# Altium PCB Auto_USBC_15W_TPS25833Q1.PcbDoc (part 2 of 2)
Units mm, origin at the board's own origin, x right, y up, seen from the top; angles counter-clockwise.
Board outline 23 x 48.5 mm, 4 copper layers (L1_Top, L2_GND, L3_GND, L4_Bottom), stack 1.564 mm thick; 40 components, 24 nets, 137 pads, 9 vias.
Unrouted connection lines stored in the file: 104.
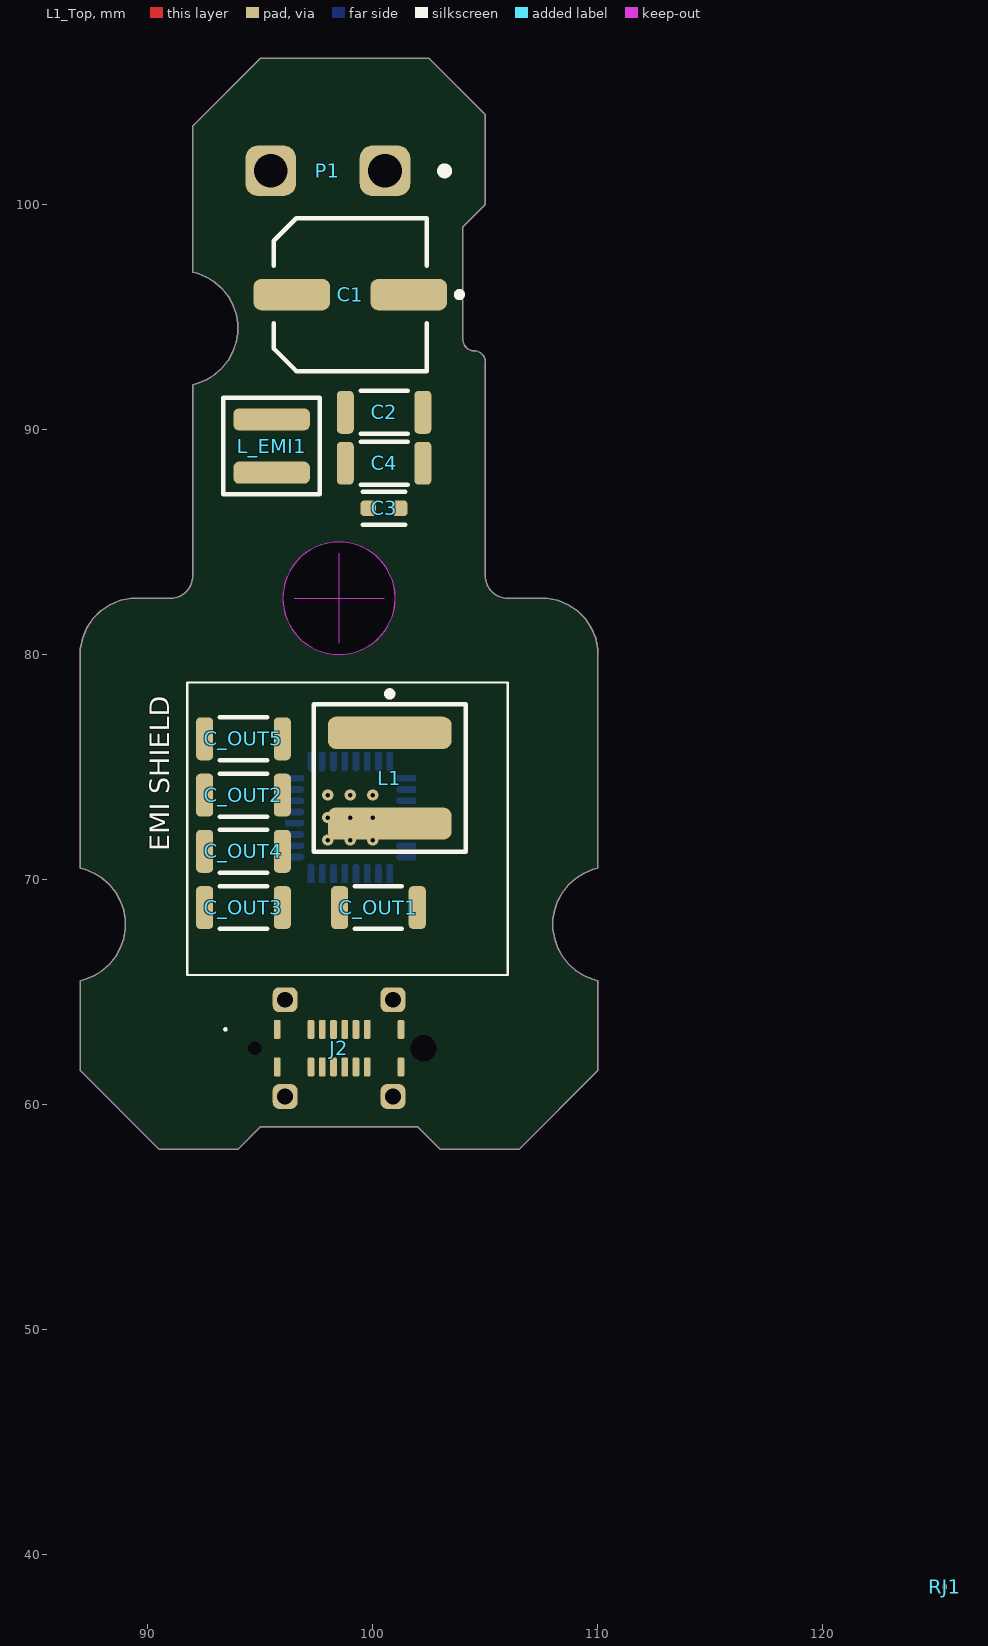
[diagram p0: L1_Top view]

## Part data (continued)
R_SET1: library part CMP-2000-07451-1, Case Code (Imperial)=0402, Manufacturer=Vishay, Max Operating Temperature=155°C, Max Power Dissipation=63mW, Min Operating Temperature=-55°C, Ratings=AEC-Q200, Temperature Coefficient=100ppm/°C, Tolerance=1%, Voltage Rating=50V, Case/Package=0402, Category="Chip SMD Resistors", China RoHS=Non-Compliant, ComponentLink1Description=https://datasheet.octopart.com:443/CRCW0402301RFKED-Vishay-datasheet-175423584.pdf?src-supplier=IHS, ComponentLink1URL=https://datasheet.octopart.com:443/CRCW0402301RFKED-Vishay-datasheet-175423584.pdf?src-supplier=IHS, ComponentLink2Description=https://datasheet.octopart.com:443/CRCW0402301RFKED-Vishay-datasheet-83961561.pdf?src-supplier=element14+APAC, ComponentLink2URL=https://datasheet.octopart.com:443/CRCW0402301RFKED-Vishay-datasheet-83961561.pdf?src-supplier=element14+APAC, ComponentLink3Description=https://datasheet.octopart.com:443/CRCW0402301RFKED-Vishay-datasheet-10882403.pdf?src-supplier=element14+APAC, ComponentLink3URL=https://datasheet.octopart.com:443/CRCW0402301RFKED-Vishay-datasheet-10882403.pdf?src-supplier=element14+APAC, ComponentLink4Description=https://datasheet.octopart.com:443/CRCW0402301RFKED-Vishay-datasheet-159614168.pdf?src-supplier=element14+APAC, ComponentLink4URL=https://datasheet.octopart.com:443/CRCW0402301RFKED-Vishay-datasheet-159614168.pdf?src-supplier=element14+APAC, ComponentLink5Description=https://datasheet.octopart.com:443/CRCW0402301RFKED-Vishay-datasheet-66077789.pdf?src-supplier=Newark, ComponentLink5URL=https://datasheet.octopart.com:443/CRCW0402301RFKED-Vishay-datasheet-66077789.pdf?src-supplier=Newark, ComponentLink6Description=https://datasheet.octopart.com:443/CRCW0402301RFKED-Vishay-datasheet-11516975.pdf?src-supplier=Newark, ComponentLink6URL=https://datasheet.octopart.com:443/CRCW0402301RFKED-Vishay-datasheet-11516975.pdf?src-supplier=Newark, ComponentLink7Description=https://datasheet.octopart.com:443/CRCW0402301RFKED-Vishay-datasheet-41302739.pdf?src-supplier=Newark, ComponentLink7URL=https://datasheet.octopart.com:443/CRCW0402301RFKED-Vishay-datasheet-41302739.pdf?src-supplier=Newark, ComponentLink8Description=https://datasheet.octopart.com:443/CRCW0402301RFKED-Vishay-datasheet-33013972.pdf?src-supplier=Newark, ComponentLink8URL=https://datasheet.octopart.com:443/CRCW0402301RFKED-Vishay-datasheet-33013972.pdf?src-supplier=Newark, ComponentLink9Description=https://datasheet.octopart.com:443/CRCW0402301RFKED-Vishay-datasheet-21226360.pdf?src-supplier=Newark, ComponentLink9URL=https://datasheet.octopart.com:443/CRCW0402301RFKED-Vishay-datasheet-21226360.pdf?src-supplier=Newark, ComponentLink10Description=https://datasheet.octopart.com:443/CRCW0402301RFKED-Vishay-datasheet-62317933.pdf?src-supplier=Farnell, ComponentLink10URL=https://datasheet.octopart.com:443/CRCW0402301RFKED-Vishay-datasheet-62317933.pdf?src-supplier=Farnell, ComponentLink11Description=https://datasheet.octopart.com:443/CRCW0402301RFKED-Vishay-datasheet-14722531.pdf?src-supplier=Farnell, ComponentLink11URL=https://datasheet.octopart.com:443/CRCW0402301RFKED-Vishay-datasheet-14722531.pdf?src-supplier=Farnell, ComponentLink12Description=https://datasheet.octopart.com:443/CRCW0402301RFKED-Vishay-datasheet-5300368.pdf?src-supplier=Farnell, ComponentLink12URL=https://datasheet.octopart.com:443/CRCW0402301RFKED-Vishay-datasheet-5300368.pdf?src-supplier=Farnell, ComponentLink13Description=https://datasheet.octopart.com:443/CRCW0402301RFKED-Vishay-datasheet-190005712.pdf?src-supplier=TME, ComponentLink13URL=https://datasheet.octopart.com:443/CRCW0402301RFKED-Vishay-datasheet-190005712.pdf?src-supplier=TME, ComponentLink14Description=https://datasheet.octopart.com:443/CRCW0402301RFKED-Vishay-datasheet-62316122.pdf?src-supplier=Future+Electronics, ComponentLink14URL=https://datasheet.octopart.com:443/CRCW0402301RFKED-Vishay-datasheet-62316122.pdf?src-supplier=Future+Electronics, ComponentLink15Description=https://datasheet.octopart.com:443/CRCW0402301RFKED-Vishay-datasheet-13544682.pdf?src-supplier=Future+Electronics, ComponentLink15URL=https://datasheet.octopart.com:443/CRCW0402301RFKED-Vishay-datasheet-13544682.pdf?src-supplier=Future+Electronics, ComponentLink16Description=https://datasheet.octopart.com:443/CRCW0402301RFKED-Vishay-datasheet-12542115.pdf?src-supplier=Future+Electronics, ComponentLink16URL=https://datasheet.octopart.com:443/CRCW0402301RFKED-Vishay-datasheet-12542115.pdf?src-supplier=Future+Electronics, ComponentLink17Description=https://datasheet.octopart.com:443/CRCW0402301RFKED-Vishay-datasheet-12533120.pdf?src-supplier=Future+Electronics, ComponentLink17URL=https://datasheet.octopart.com:443/CRCW0402301RFKED-Vishay-datasheet-12533120.pdf?src-supplier=Future+Electronics, ComponentLink18Description=https://datasheet.octopart.com:443/CRCW0402301RFKED-Vishay-datasheet-12520421.pdf?src-supplier=Future+Electronics, ComponentLink18URL=https://datasheet.octopart.com:443/CRCW0402301RFKED-Vishay-datasheet-12520421.pdf?src-supplier=Future+Electronics, ComponentLink19Description=https://datasheet.octopart.com:443/CRCW0402301RFKED-Vishay-datasheet-12511221.pdf?src-supplier=Future+Electronics, ComponentLink19URL=https://datasheet.octopart.com:443/CRCW0402301RFKED-Vishay-datasheet-12511221.pdf?src-supplier=Future+Electronics, ComponentLink20Description=https://datasheet.octopart.com:443/CRCW0402301RFKED-Vishay-Dale-datasheet-47688880.pdf?src-supplier=RS+(Formerly+Allied+Electronics), ComponentLink20URL=https://datasheet.octopart.com:443/CRCW0402301RFKED-Vishay-Dale-datasheet-47688880.pdf?src-supplier=RS+(Formerly+Allied+Electronics), ComponentLink21Description=https://datasheet.octopart.com:443/CRCW0402301RFKED-Vishay-datasheet-12001583.pdf?src-supplier=RS+(Formerly+Allied+Electronics), ComponentLink21URL=https://datasheet.octopart.com:443/CRCW0402301RFKED-Vishay-datasheet-12001583.pdf?src-supplier=RS+(Formerly+Allied+Electronics), ComponentLink22Description=https://datasheet.octopart.com:443/CRCW0402301RFKED-Vishay-datasheet-5306405.pdf?src-supplier=RS+(Formerly+Allied+Electronics), ComponentLink22URL=https://datasheet.octopart.com:443/CRCW0402301RFKED-Vishay-datasheet-5306405.pdf?src-supplier=RS+(Formerly+Allied+Electronics), ComponentLink23Description=https://datasheet.octopart.com:443/CRCW0402301RFKED-Vishay-datasheet-11540273.pdf?src-supplier=Arrow+Electronics, ComponentLink23URL=https://datasheet.octopart.com:443/CRCW0402301RFKED-Vishay-datasheet-11540273.pdf?src-supplier=Arrow+Electronics, ComponentLink24Description=https://datasheet.octopart.com:443/CRCW0402301RFKED-Vishay-datasheet-8445837.pdf?src-supplier=element14, ComponentLink24URL=https://datasheet.octopart.com:443/CRCW0402301RFKED-Vishay-datasheet-8445837.pdf?src-supplier=element14, ComponentLink25Description=https://datasheet.octopart.com:443/CRCW0402301RFKED-Vishay-datasheet-5377255.pdf?src-supplier=Garrett, ComponentLink25URL=https://datasheet.octopart.com:443/CRCW0402301RFKED-Vishay-datasheet-5377255.pdf?src-supplier=Garrett, ComponentLink26Description=https://datasheet.octopart.com:443/CRCW0402301RFKED-Vishay-datasheet-148188.pdf?src-supplier=Garrett, ComponentLink26URL=https://datasheet.octopart.com:443/CRCW0402301RFKED-Vishay-datasheet-148188.pdf?src-supplier=Garrett, ComponentLink27Description=https://datasheet.octopart.com:443/CRCW0402301RFKED-Vishay-datasheet-42367.pdf?src-supplier=Garrett, ComponentLink27URL=https://datasheet.octopart.com:443/CRCW0402301RFKED-Vishay-datasheet-42367.pdf?src-supplier=Garrett, ComponentLink28Description=http://sigma.octopart.com:80/rohs_statement/Vishay-company-15.pdf?src-supplier=Compliance+Statements, ComponentLink28URL=http://sigma.octopart.com:80/rohs_statement/Vishay-company-15.pdf?src-supplier=Compliance+Statements, Composition="Thick Film", Contact Plating=Tin, Depth=500µm, Features="Automotive AEC-Q200", Height=350µm, Lead Free="Lead Free", Length=1mm, Lifecycle Status=Production, Manufacturer Part Number=CRCW0402301RFKED, Military Standard=Not, Mounting Technology="Surface Mount", Number of Terminals=2, Number of Terminations=2, Packaging="Cut Tape", Pins=2, Power Rating=63mW, Pricing="10000=0.0043, 40000=0.0042, 150000=0.004, 250000=0.0039, 500000=0.0038 (USD)", Radiation Hardening=No, REACH SVHC=Unaffected, RoHS=Compliant, Schedule B="8533210045, 8533210045|8533210045|8533210045|8533210045|8533210045|8533210045|8533210045|8533210045|8533210045|8533210045|8533210045|8533210045|8533210045|8533210045|8533210045|8533210045|8533210045|8533210045|8533210045|8533210045|8533210045|8533210045|8533210045|85", Stock=190000, Supplier="Future Electronics", Supplier Part Number=CRCW0402301RFKED, Termination=SMD/SMT, Voltage Rating (DC)=50V, Weight=652.039032µg, Width=500µm, Working Voltage=50V
RJ1: library part CMP-009-00120-1, Max Operating Temperature=155°C, Min Operating Temperature=-55°C, Pins=2
TVS1: library part CMP-1060-00229-1, Breakdown Voltage=21.05V, Clamping Voltage=29.2V, Manufacturer=Bourns, Manufacturer Part Number=SMBJ18CA-Q, Max Breakdown Voltage=22.1V, Max Operating Temperature=150°C, Min Breakdown Voltage=20V, Min Operating Temperature=-55°C, Peak Pulse Power=600W, Peak Reverse Current=1µA, Ratings=AEC-Q101, Reverse Standoff Voltage=18V, Category="TVS Diodes", China RoHS=Non-Compliant, ComponentLink1Description=https://datasheet.octopart.com:443/SMBJ18CA-Q-Bourns-datasheet-179980062.pdf?src-supplier=TME, ComponentLink1URL=https://datasheet.octopart.com:443/SMBJ18CA-Q-Bourns-datasheet-179980062.pdf?src-supplier=TME, ComponentLink2Description=https://datasheet.octopart.com:443/SMBJ18CA-Q-Bourns-datasheet-154834311.pdf?src-supplier=Master+Electronics, ComponentLink2URL=https://datasheet.octopart.com:443/SMBJ18CA-Q-Bourns-datasheet-154834311.pdf?src-supplier=Master+Electronics, ComponentLink3Description=http://sigma.octopart.com:80/conflict_mineral_statement/Bourns-company-36.pdf?src-supplier=Compliance+Statements, ComponentLink3URL=http://sigma.octopart.com:80/conflict_mineral_statement/Bourns-company-36.pdf?src-supplier=Compliance+Statements, Export Control Classification Number (ECCN) Code=EAR99, Harmonized Tariff Schedule (HTS) Code=8541.10.00.50, Introduction Date=2018-01-02, Lifecycle Status=Production, Number of Elements=1, Number of Terminals=2, Polarity=Bidirectional, Pricing="5=0.131 (USD)", REACH SVHC=Affected, RoHS=Compliant, Schedule B="8541100080, 8541100080|8541100080|8541100080|8541100080|8541100080", Stock=5, Supplier="Arrow Electronics", Supplier Part Number=SMBJ18CA-Q
U1: library part GeneratedSymbol_2, "MOSFET Array, Dual P Channel, 60 V, 8 A, 48 Milliohms, SOIC, 8 Pins, Surface Mount", Continuous Drain Current (ID)=8A, Drain to Source Resistance=48mΩ, Drain to Source Voltage (Vds)=60V, Manufacturer=Vishay, Max Operating Temperature=175°C, Max Power Dissipation=5W, Min Operating Temperature=-55°C, Ratings=AEC-Q101, Category=MOSFETs, ComponentLink1Description=https://datasheet.octopart.com:443/SQ4917CEY-T1_GE3-Vishay-datasheet-181474669.pdf?src-supplier=IHS, ComponentLink1URL=https://datasheet.octopart.com:443/SQ4917CEY-T1_GE3-Vishay-datasheet-181474669.pdf?src-supplier=IHS, ComponentLink2Description=http://sigma.octopart.com:80/rohs_statement/Vishay-company-15.pdf?src-supplier=Compliance+Statements, ComponentLink2URL=http://sigma.octopart.com:80/rohs_statement/Vishay-company-15.pdf?src-supplier=Compliance+Statements, Country of Origin=Germany, Export Control Classification Number (ECCN) Code=EAR99, Harmonized Tariff Schedule (HTS) Code=8541.29.00.95, Introduction Date=2023-02-14, Lifecycle Status=Production, Manufacturer Part Number=SQ4917CEY-T1_GE3, Min Breakdown Voltage=60V, Number of Elements=2, Number of Terminals=8, Power Dissipation=5W, Pricing="1=1.7867, 10=1.158, 50=0.935, 100=0.7846, 500=0.5451, 2500=0.5205 (USD)", RoHS=Compliant, Stock=5000, Supplier="Arrow Electronics", Supplier Part Number=SQ4917CEY-T1_GE3
U2: library part GeneratedSymbol, "USB Type-C and BC1.2 5V 3.5A Output 36V Input Synchronous DC/DC Regulator 32-Pin VQFN", Case/Package=VQFN, Manufacturer="Texas Instruments", Manufacturer Lifecycle Status=ACTIVE, Category="USB Interface ICs", ComponentLink1Description=https://octopart.com:443/opatz8j6/c1?t=QdtQ_5y6OoYO10vGMBHo0MkWWNg3WZcKByxVKRKibkrIArPmB0huZ0PTWgiVQyVM0r-KErAlqgl_GtZqS-zfbTH9MSEVf23tu6zsP7SwoH3cElgJzC1njavEoiPtv5zJyzI5TugnKjD-MwQN_tWNq7D4zs4hg9Jvnjhyur9u1VAzxy-x97OLvkn3T5o38e-A3hbTv1voPLaqbRoeq4uSWuj4oXJZ_6x5obgH2QuRMC6C-RM4You7UXlmIiUE0xXQlfjdTdGh5Mzji6m775kF51dkfg-oVXXT7eQkakUfxTXIZTGRZ9S2Te6OgLonkCf4Q48jzw2hIzpT3B6kxxuzoKhvga5DM2Eb2fh4XFQ3zjw1DN_Mg95a_8n3WVcIjlOyBCLqgiEN8_34Bg&src-supplier=Texas+Instruments, ComponentLink1URL=https://octopart.com:443/opatz8j6/c1?t=QdtQ_5y6OoYO10vGMBHo0MkWWNg3WZcKByxVKRKibkrIArPmB0huZ0PTWgiVQyVM0r-KErAlqgl_GtZqS-zfbTH9MSEVf23tu6zsP7SwoH3cElgJzC1njavEoiPtv5zJyzI5TugnKjD-MwQN_tWNq7D4zs4hg9Jvnjhyur9u1VAzxy-x97OLvkn3T5o38e-A3hbTv1voPLaqbRoeq4uSWuj4oXJZ_6x5obgH2QuRMC6C-RM4You7UXlmIiUE0xXQlfjdTdGh5Mzji6m775kF51dkfg-oVXXT7eQkakUfxTXIZTGRZ9S2Te6OgLonkCf4Q48jzw2hIzpT3B6kxxuzoKhvga5DM2Eb2fh4XFQ3zjw1DN_Mg95a_8n3WVcIjlOyBCLqgiEN8_34Bg&src-supplier=Texas+Instruments, ComponentLink2Description=https://datasheet.octopart.com:443/TPS25833QWRHBRQ1-Texas-Instruments-datasheet-165812046.pdf?src-supplier=SHENGYU+ELECTRONICS, ComponentLink2URL=https://datasheet.octopart.com:443/TPS25833QWRHBRQ1-Texas-Instruments-datasheet-165812046.pdf?src-supplier=SHENGYU+ELECTRONICS, ComponentLink3Description=http://sigma.octopart.com:80/reach_statement/Texas-Instruments-company-64.pdf?src-supplier=Compliance+Statements, ComponentLink3URL=http://sigma.octopart.com:80/reach_statement/Texas-Instruments-company-64.pdf?src-supplier=Compliance+Statements, ComponentLink4Description=http://sigma.octopart.com:80/conflict_mineral_statement/Texas-Instruments-company-63.pdf?src-supplier=Compliance+Statements, ComponentLink4URL=http://sigma.octopart.com:80/conflict_mineral_statement/Texas-Instruments-company-63.pdf?src-supplier=Compliance+Statements, Height=1mm, Length=5mm, Lifecycle Status=Production, Manufacturer Part Number=TPS25833QWRHBRQ1, Pins=32, Pricing="3000=2.35 (USD)", RoHS=Compliant, Schedule B=8542390000|8542390000, Stock=3000, Supplier="Arrow Electronics", Supplier Part Number=TPS25833QWRHBRQ1, Thickness=900µm, Width=5mm
ZD1: library part CMP-1060-00307-1, "ZENER DIODE SOD123 T&R 3K / Zener Diode 12 V 370 mW ±5.42% Surface Mount SOD-123", Manufacturer="Diodes Inc.", Manufacturer Part Number=BZT52C12Q-7-F, Max Operating Temperature=150°C, Max Power Dissipation=370mW, Min Operating Temperature=-65°C, Peak Reverse Current=100nA, Ratings=AEC-Q101, Reference Voltage=12V, Reverse Standoff Voltage=8V, Voltage Tolerance=5.39%, Zener Current=5mA, Category="Zener Diodes", China RoHS=Compliant, ComponentLink1Description=https://datasheet.octopart.com:443/BZT52C12Q-7-F-Diodes-Inc.-datasheet-101585693.pdf?src-supplier=HQonline, ComponentLink1URL=https://datasheet.octopart.com:443/BZT52C12Q-7-F-Diodes-Inc.-datasheet-101585693.pdf?src-supplier=HQonline, Composition=Zener, Impedance=25Ω, Lifecycle Status=Production, Number of Elements=1, Number of Terminals=2, Polarity=Unidirectional, Pricing="3000=0.02104, 6000=0.02089, 12000=0.02056, 24000=0.02024, 48000=0.02 (USD)", REACH SVHC=Unaffected, RoHS=Compliant, Schedule B="8541100050, 8541100050|8541100050|8541100050|8541100050|8541100050", Stock=90000, Supplier=Avnet, Supplier Part Number=BZT52C12Q-7-F

## Via types
v1: diameter 0.5, hole 0.2, L1_Top to L4_Bottom, 9 vias

## Nets (pads, with @x,y where several pads share a name; then routed paths per layer and width w, separated by ;. In a path a pad name is that pad's centre, name@x,y a point inside that pad or via, vN(x,y) a via of type N, cw(c..) or ccw(c..) an arc to the next point about the centre after c; other vN are vias at no path point)
AGND: C8.2 C9.2 C10.2 C_BUS1.2 R4.1 R5.1 R6.1 R7.1 R_NTC1.1 RJ1.2 U2.5 U2.16
BOOT: C5.1 U2.32
BUS_SENSE: C_BUS1.1 R_BUS1.2 U2.15
CSP_SENSE: R_SET1.2 U2.14
DM_IN: J2.A7 J2.B7 U2.17
EN: R3.1 R4.2 U2.4
ILIMIT_SET: R7.2 U2.12
IMON_SET: R6.2 U2.11
NetC5_2: C5.2 R2.1
NTC_SENSE: NTC1.2 R_NTC1.2 U2.8
PGND: C1.1 C2.2 C3.2 C4.2 C6.2 C7.2 C11.2 C12.2 C14.2 C_OUT1.2 C_OUT2.2 C_OUT3.2 C_OUT4.2 C_OUT5.2 J2.A1 J2.A12 J2.B1 J2.B12 J2.MH3 J2.MH4 J2.MH5 J2.MH6 P1.1 R1.1 RJ1.1 TVS1.2 U2.25 U2.26 U2.27 U2.33
  other v1: 98,71.75 99,71.75 100,71.75 98,72.75 99,72.75 100,72.75 98,73.75 99,73.75 100,73.75
PMOS_GATE: R1.2 U1.2 U1.4 ZD1.2
PMOS_SOURCE: U1.1 U1.3 ZD1.1
RT_SET: R5.2 U2.9
SW_NODE: L1.1 R2.2 U2.28 U2.29 U2.30 U2.31
USB_CC1: C9.1 J2.A5 U2.20
USB_CC2: C10.1 J2.B5 U2.19
USB_DP: J2.A6 J2.B6 U2.18
USB_VBUS: C8.1 C14.1 J2.A4 J2.A9 J2.B4 J2.B9 R_BUS1.1 R_SENSE1.2 U2.13
VBAT: P1.2 TVS1.1 U1.7 U1.8
VCC_5V: C11.1 C12.1 NTC1.1 U2.6 U2.21
VIN_FILTERED: C2.1 C3.1 C4.1 C6.1 C7.1 L_EMI1.2 R3.2 U2.1 U2.2 U2.3
VIN_PROT: C1.2 L_EMI1.1 U1.5 U1.6
VOUT_PRE_SENSE: C_OUT1.1 C_OUT2.1 C_OUT3.1 C_OUT4.1 C_OUT5.1 L1.2 R_SENSE1.1 R_SET1.1
pads on no net: J2.A8 J2.B8 J2.MH1 J2.MH2 U2.7 U2.10 U2.22 U2.23 U2.24

## Polygon pours and split planes (outlines as drawn)
no net on L2_GND (split plane): 264 vertices, not listed, extent 87.51,58.51 109.49,105.99
no net on L3_GND (split plane): 264 vertices, not listed, extent 87.51,58.51 109.49,105.99

## Keep-outs
Keep-Out Layer:
  circle w0.013: c98.5,82.5 r2.5
  lines w0.013: 96.5,82.5 100.5,82.5 ; 98.5,80.5 98.5,84.5 ; 87,61.5 87,65.5 87.209,65.556 87.608,65.72 87.974,65.949 88.296,66.236 88.566,66.573 88.775,66.951 88.918,67.358 88.991,67.784 88.991,68.216 88.918,68.641 88.775,69.049 88.566,69.426 88.296,69.764 87.974,70.051 87.608,70.279 87.209,70.444 87,70.5 87,80 87,80.246 87.096,80.729 87.285,81.184 87.558,81.594 87.906,81.942 88.316,82.215 88.771,82.404 89.254,82.5 89.5,82.5 91,82.5 91.098,82.505 91.29,82.543 91.471,82.618 91.634,82.727 91.773,82.866 91.882,83.029 91.957,83.21 91.995,83.402 92,83.5 92,92 92.209,92.056 92.608,92.22 92.974,92.449 93.296,92.736 93.566,93.073 93.775,93.451 93.918,93.858 93.991,94.284 93.991,94.716 93.918,95.141 93.775,95.549 93.566,95.926 93.296,96.264 92.974,96.551 92.608,96.779 92.209,96.944 92,97 92,103.5 95,106.5 102.5,106.5 105,104 105,100 104,99 104,94 104.01,93.902 104.084,93.722 104.222,93.584 104.402,93.51 104.5,93.5 104.599,93.5 104.783,93.424 104.924,93.283 105,93.099 105,93 105,83.5 105.005,83.402 105.043,83.21 105.118,83.029 105.227,82.866 105.366,82.727 105.529,82.618 105.71,82.543 105.902,82.505 106,82.5 107.5,82.5 107.746,82.5 108.229,82.404 108.684,82.215 109.094,81.942 109.442,81.594 109.715,81.184 109.904,80.729 110,80.246 110,80 110,70.5 109.791,70.444 109.392,70.28 109.026,70.051 108.703,69.764 108.434,69.427 108.224,69.049 108.082,68.642 108.009,68.216 108.009,67.784 108.082,67.359 108.224,66.951 108.434,66.573 108.703,66.236 109.026,65.949 109.392,65.72 109.791,65.556 110,65.5 110,61.5 106.5,58 103,58 102,59 95,59 94,58 90.5,58 87,61.5

## Silkscreen, mask and mechanical layers (free items; w line width, h text height)
Top Overlay:
  lines w0.1: 91.75,65.75 106,65.75 106,78.75 91.75,78.75 91.75,65.75
  text "EMI SHIELD" at 91.232,71.25 h1.5 r90
Dimensions:
  lines w0.15: 77,58 87,58 87,48 ; 77,106.5 87,106.5 ; 81.667,59 82,58 ; 81.667,105.5 82,106.5 ; 82,77.845 82,58 ; 82,86.655 82,106.5 ; 82.333,59 82,58 ; 82.333,105.5 82,106.5 ; 88,52.667 87,53 ; 88,53.333 87,53 ; 95.011,53 87,53 ; 101.989,53 110,53 ; 109,52.667 110,53 ; 109,53.333 110,53 ; 110,48 110,58
  text "48.5 (mm)" at 82.652,78.099 h1 r90
  text "23 (mm)" at 95.265,52.348 h1
Top Courtyard:
  lines w0.013: 87,65.5 87,70.5 ; 92,92 92,97 ; 110,65.5 110,70.5